# Altium PCB PCB1.PcbDoc
Units mm, origin at the board's own origin, x right, y up, seen from the top; angles counter-clockwise.
Board outline 115 x 155 mm, 2 copper layers (Top Layer, Bottom Layer); 81 components, 46 nets, 213 pads, 63 vias.
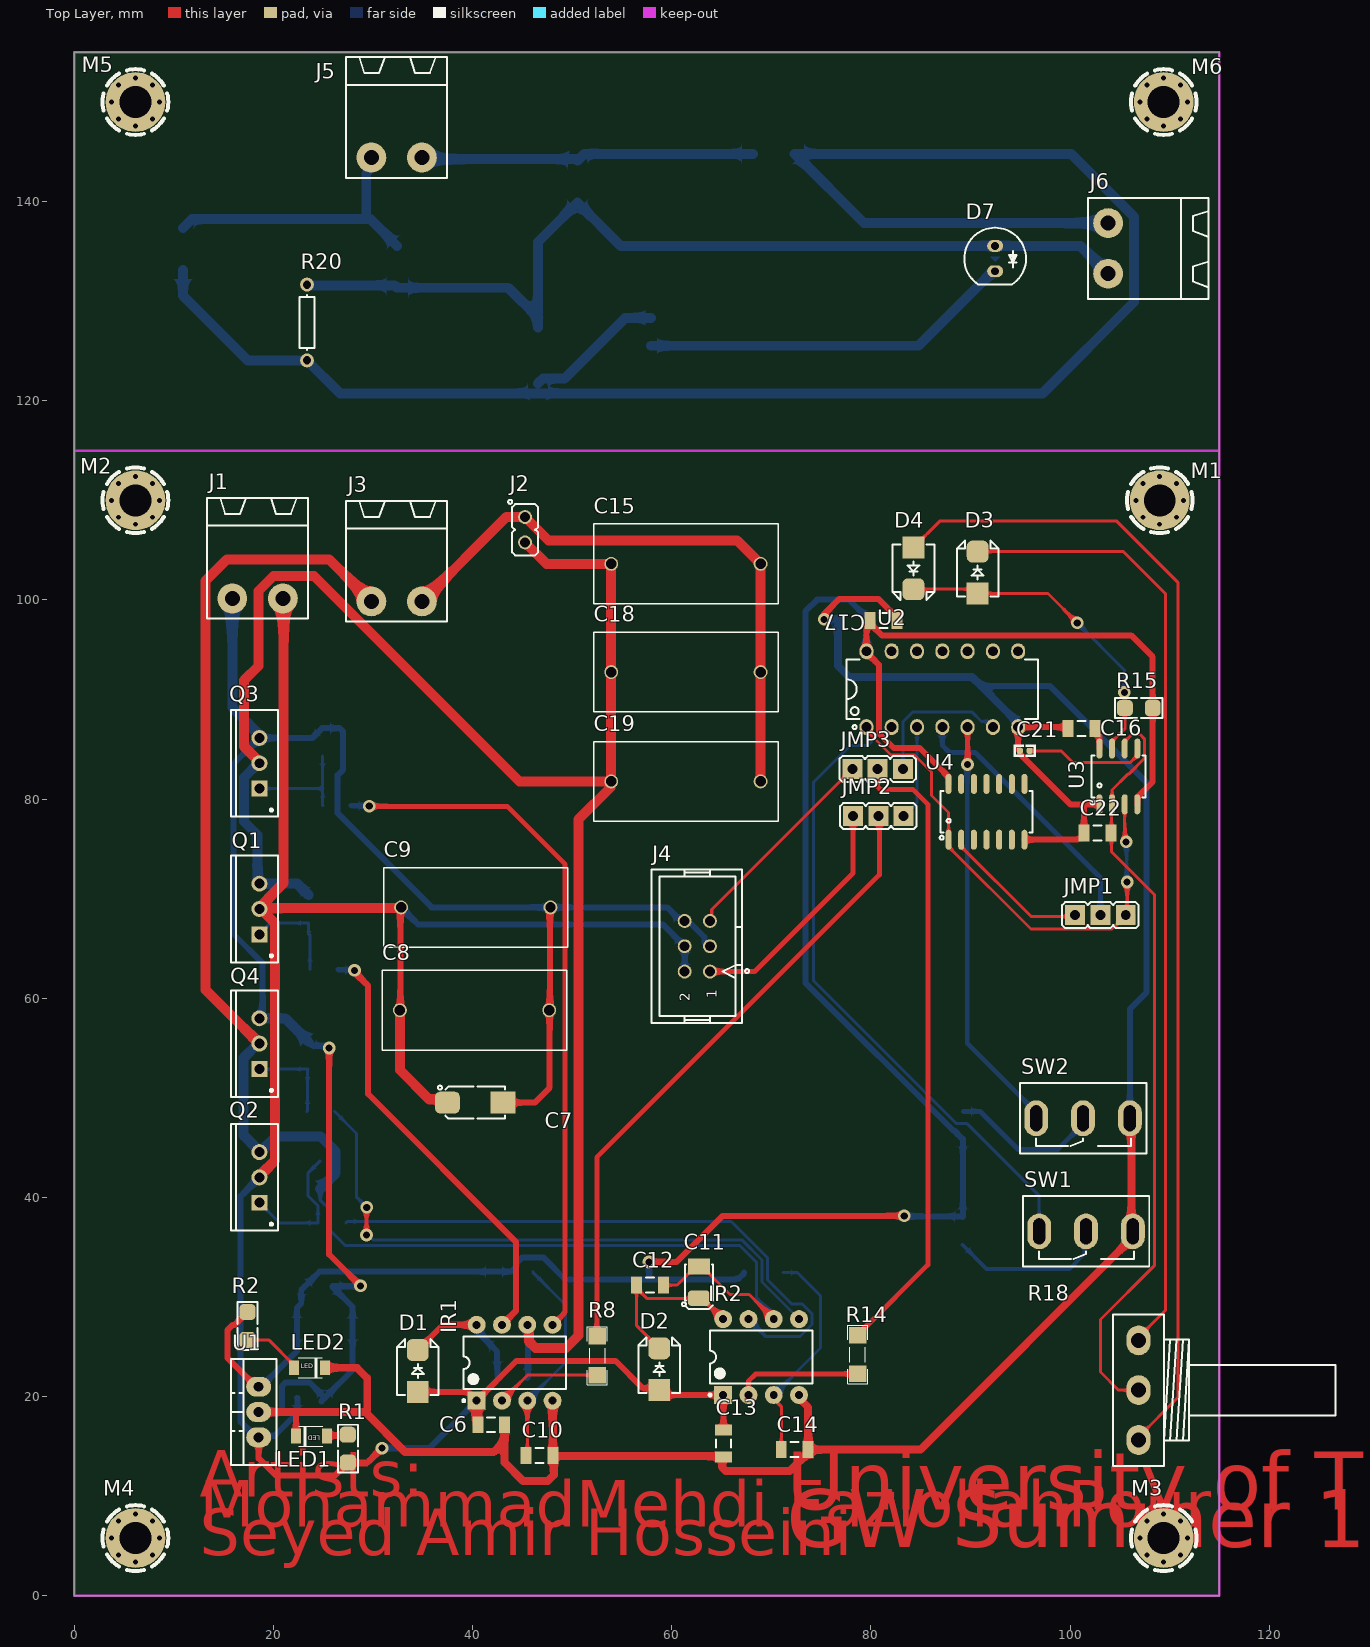
[diagram p0: Top Layer view]
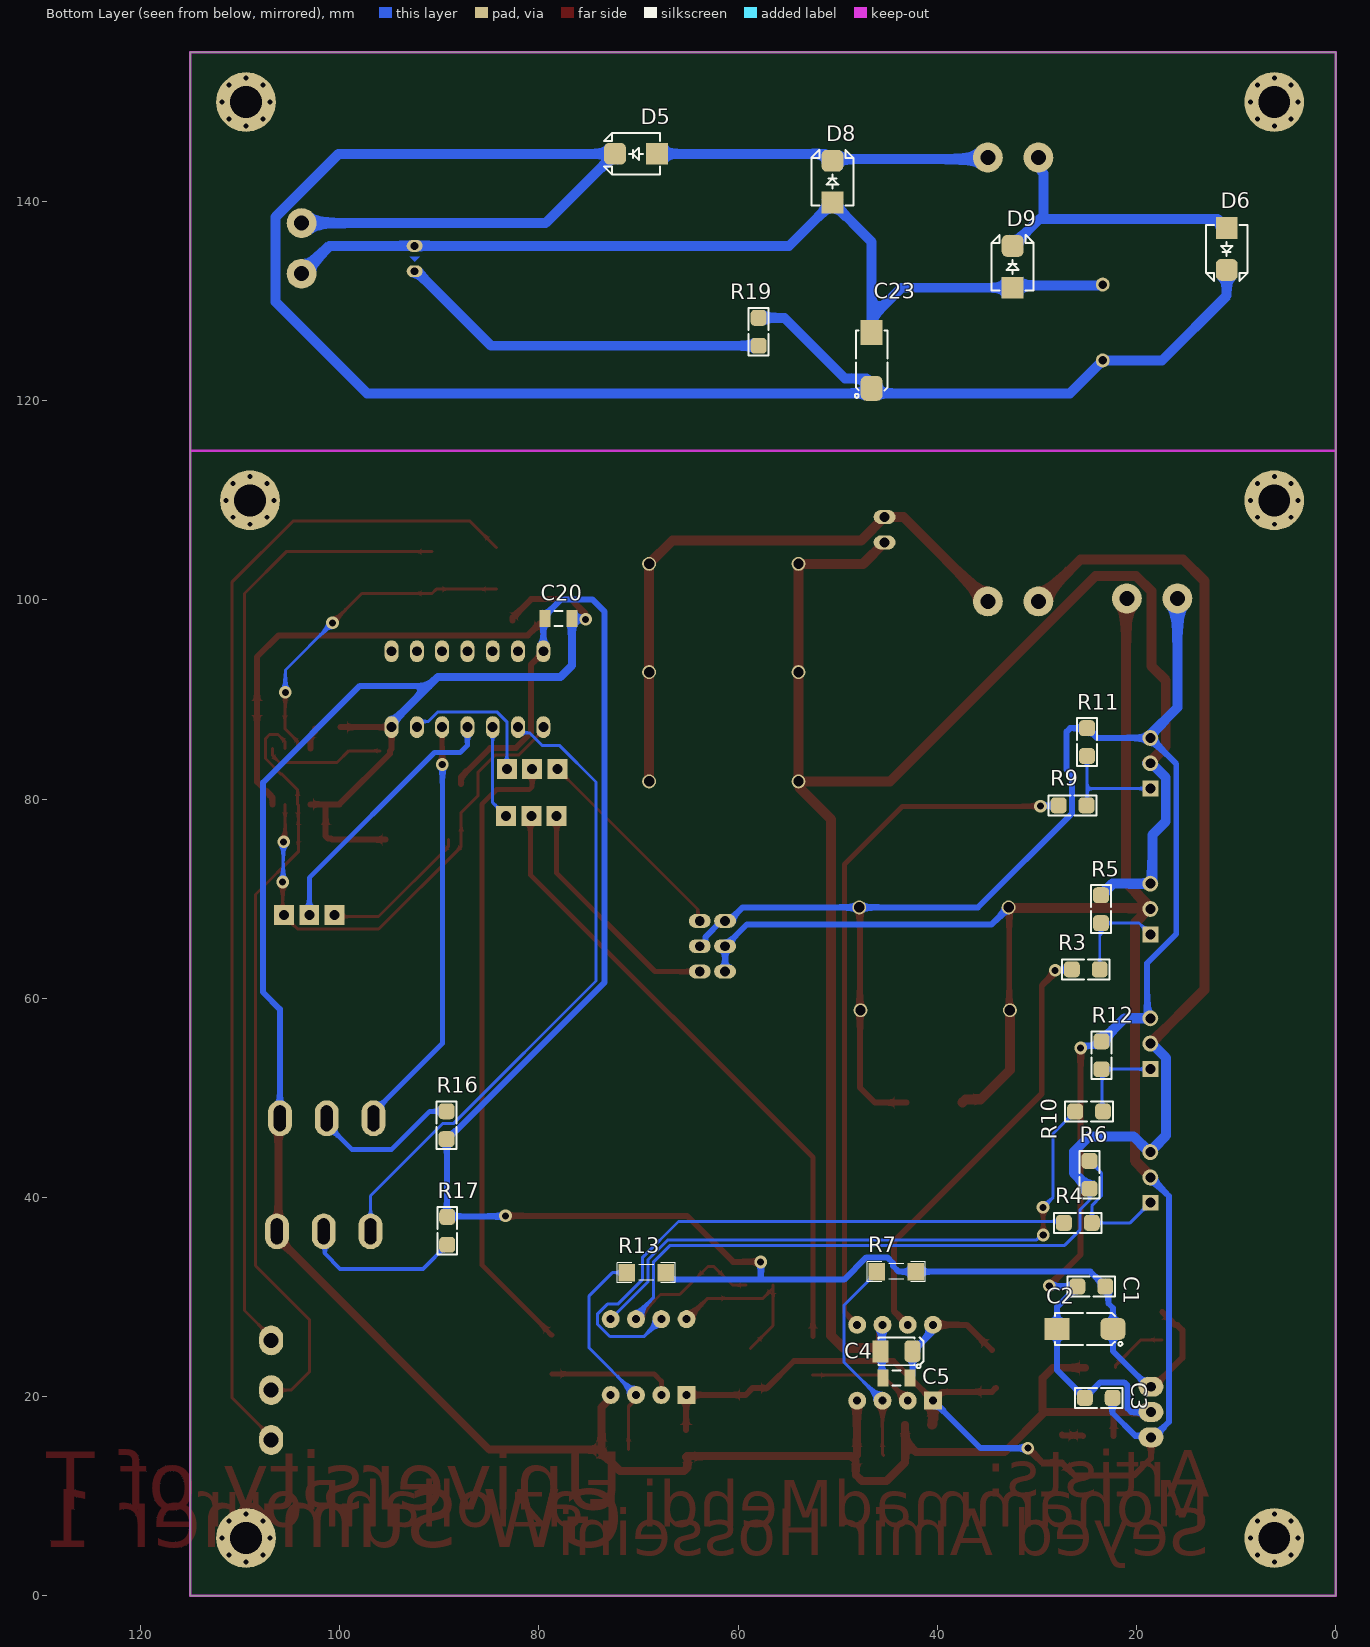
[diagram p1: Bottom Layer view, seen from below]

## Layer stack, top to bottom
Top Solder: solder mask 0.0102, Solder Resist, Dk 3.5
Top Layer: signal copper 0.0356
Dielectric 1: dielectric 0.32, FR-4, Dk 4.8
Bottom Layer: signal copper 0.0356
Bottom Solder: solder mask 0.0102, Solder Resist, Dk 3.5

## Board outline
0,0 0,155 115,155 115,0

## Design rules (kind name [scope] priority, off if disabled: settings)
Clearance [All] p1: gap=0.254 ignorepadtopadclearanceinfootprint=FALSE except(0: Arc-Hole Track-Hole SMDPad-Hole THPad-Hole Via-Hole Fill-Hole Poly-Hole Region-Hole Text-Hole)
Height [All] p1: minheight=0 maxheight=50 prefheight=12.7
PolygonConnect [All] p1: connectstyle=Relief reliefconductorwidth=0.254 reliefentries=4 polygonreliefangle="90 Angle" airgapwidth=0.254
RoutingVias [All] p1: holewidth=0.711 width=1.27 viastyle="Through Hole" minholewidth=0.711 minwidth=1.27 maxholewidth=0.711 maxwidth=1.27
SolderMaskExpansion [All] p1: expansion=0.102 istentingtop=FALSE
Width Width_1 [(InNet('+5') OR InNet('+15') OR InNet('GND'))] p1: maxlimit=1 minlimit=0.6 preferedwidth=0.6
Width [All] p2: maxlimit=1 minlimit=0.3 preferedwidth=1
29 further rules are at their usual default settings.

## Classes and differential pairs
component class Sheet2: C23 D5 D6 D7 D8 D9 J5 J6 M5 M6 R19 R20
component class Sheet1: C1 C2 C3 C4 C5 C6 C7 C8 C9 C10 C11 C12 C13 C14 C15 C16 C17 C18 C19 C20 C21 C22 D1 D2 D3 D4 IR1 IR2 J1 J2 J3 J4 J? JMP1 JMP2 JMP3 LED1 LED2 M1 M2 M3 M4 Q1 Q2 Q3 Q4 R1 R2 R3 R4 R5 R6 R7 R8 R9 R10 R11 R12 R13 R14 R15 R16 R17 R18 SW1 SW2 U1 U2 U3 U4

## Components (designator, comment, footprint, x,y, rotation, side; value= is the part's Value field where it differs from the comment)
C1 "100nF" C1206#1 24.525,31.05 r180 bottom
C2 "10uF" C_TN_6032 25.15,26.8 r0 bottom
C3 "100nF" C1206#1 23.775,19.875 r180 bottom
C4 "10uF-25V" C_TN_3528 44.075,24.55 r0 bottom
C5 "1uF" C1206#2 44.1,21.85 r180 bottom
C6 "1uF" C1206#2 41.875,17.175 r180 top
C7 "33uF" C_TN_6032 40.275,49.525 r0 top
C8 "ECQE6184KF" CAPRR1500W80L1850T800H1600 40.2,58.8 r180 top
C9 "ECQE6184KF" CAPRR1500W80L1850T800H1600 40.325,69.125 r180 top
C10 "100nF" C1206#2 46.725,14.1 r180 top
C11 "10uF-25V" C_TN_3528 62.725,31.475 r90 top
C12 "1uF" C1206#2 57.825,31.2 r180 top
C13 "1uF" C1206#2 65.2,15.3 r90 top
C14 "100nF" C1206#2 72.35,14.675 r180 top
C15 "ECQE6184KF" CAPRR1500W80L1850T800H1600 61.425,103.625 r180 top
C16 "100nF" C1206#2 101.15,87.075 r0 top
C17 "1uF" C1206#2 81.275,97.925 r180 top
C18 "ECQE6184KF" CAPRR1500W80L1850T800H1600 61.425,92.75 r180 top
C19 "ECQE6184KF" CAPRR1500W80L1850T800H1600 61.425,81.775 r180 top
C20 "1uF" C1206#2 78.025,98.15 r0 bottom
C21 "1nF" C0402 95.45,84.85 r0 top
C22 "1nF" c1206 102.75,76.575 r0 top
C23 "33uF" C_TN_6032 46.575,124.05 r90 bottom
D1 "SS34" D_SMB 34.5,22.575 r90 top
D2 "SS34" D_SMB 58.75,22.75 r90 top
D3 "SS34" D_SMB 90.725,102.75 r90 top
D4 "SS34" D_SMB 84.275,103.175 r270 top
D5 "SS34" D_SMB 70.25,144.8 r0 bottom
D6 "SS34" D_SMB 10.925,135.25 r270 bottom
D7 "LED5MM_RED" LED5MM_RED 92.475,134.275 r270 top
D8 "SS34" D_SMB 50.525,142 r90 bottom
D9 "SS34" D_SMB 32.425,133.45 r90 bottom
IR1 "IR2104" 8P3 44.225,23.4 r90 top
IR2 "IR2104" 8P3 68.975,23.975 r90 top
J1 "CONN_TB2" MSTB_2 18.415,100.15 r0 top
J2 "HDRM2" HDR_M_1X2 45.275,107.05 r270 top
J3 "CONN_TB2" MSTB_2 32.375,99.85 r0 top
J4 "IDC_2X3" IDC_2X3 62.57,65.225 r90 top
J5 "CONN_TB2" MSTB_2 32.375,144.425 r0 top
J6 "CONN_TB2" MSTB_2 103.825,135.3 r270 top
JMP1 "Jumper 3 Pin" "Jumper 3" 103.05,68.35 r180 top value=1*3
JMP2 "Jumper 3 Pin" "Jumper 3" 80.75,78.3 r180 top value=1*3
JMP3 "Jumper 3 Pin" "Jumper 3" 80.675,83.025 r180 top value=1*3
LED1 "LED SMD 1206 GREEN" "LED 1206 @" 23.825,16.025 r180 top
LED2 "LED SMD 1206 GREEN" "LED 1206 @" 23.625,22.9 r0 top
M1 "DNP/MH" SCMH_M3 109,110 r0 top
M2 "DNP/MH" SCMH_M3 6.15,110 r0 top
M3 "DNP/MH" SCMH_M3 109.4,5.8 r0 top
M4 "DNP/MH" SCMH_M3 6.15,5.8 r0 top
M5 "DNP/MH" SCMH_M3 6.15,150 r0 top
M6 "DNP/MH" SCMH_M3 109.4,150 r0 top
Q1 "IRF740" "TO-220 AB" 18.6,68.965 r90 top
Q2 "IRF740" "TO-220 AB" 18.6,42.01 r90 top
Q3 "IRF740" "TO-220 AB" 18.6,83.6 r90 top
Q4 "IRF740" "TO-220 AB" 18.6,55.45 r90 top
R1 "3.3K" R1206 27.475,14.775 r270 top
R2 "1.2K" R1206 17.4,27.1 r90 top
R3 "68R" R1206 25.075,62.9 r0 bottom
R4 "68R" R1206 25.875,37.45 r0 bottom
R5 "10K" R1206 23.55,68.95 r270 bottom
R6 "10K" R1206 24.7,42.275 r90 bottom
R7 "10K" RESC4817X04N 44.1,32.55 r180 bottom
R8 "1k" RESC4817X04N 52.525,24.1 r90 top
R9 "68R" R1206 26.4,79.375 r0 bottom
R10 "68R" R1206 24.75,48.625 r0 bottom
R11 "10K" R1206 24.95,85.725 r270 bottom
R12 "10K" R1206 23.5,54.275 r270 bottom
R13 "10K" RESC4817X04N 69.225,32.45 r180 bottom
R14 "1k" RESC4817X04N 78.675,24.225 r90 top
R15 "1K" R1206 106.9,89.15 r0 top
R16 "10K" R1206 89.275,47.25 r90 bottom
R17 "10K" R1206 89.2,36.65 r270 bottom
R18 "POT10K" VOL_R 106.875,20.65 r270 top
R19 "10K" R1206 57.925,126.925 r90 bottom
R20 "Res1" AXIAL-0.3 23.375,127.86 r270 top value=220
SW1 "ToggleSwitch" SWTOG_SPDT_S_7101SY 101.601,36.6 r180 top
SW2 "ToggleSwitch" SWTOG_SPDT_S_7101SY 101.301,47.95 r180 top
U1 "MC78M05" TO220_3 18.525,18.45 r90 top
U2 "SN7408" DIP_14 87.17,91.035 r90 top
U3 "NE555P" SO_8 104.85,82.275 r90 top
U4 "7404" SO_14 91.61,78.725 r90 top

## Footprints (in the part's own frame and the unit in brackets; to place one, negate y for a bottom-side part, rotate by r counter-clockwise, add the part's x,y. Pads: shape width x height; smd on the part's side, far side on the other; paste and mask are expansions set on the pad)
8P3 [mm] "DIP, 8-Leads, Row Spacing 7.62mm, Pitch 2.54mm, Body 9.59x6.61mm"
  rect 1.8x1.8 hole 0.8: 1(-3.81,3.81)
  round 1.8 hole 0.8: 2(-3.81,1.27) 3(-3.81,-1.27) 4(-3.81,-3.81) 5(3.81,-3.81) 6(3.81,-1.27) 7(3.81,1.27) 8(3.81,3.81)
  silkscreen extent -3.93,-5.15 2.65,5.23, body extent -3.88,-5.4 3.88,5.4, height 4.5
AXIAL-0.3 [mm] "Axial Device, Thru-Hole; 2 Leads; 0.3 in Pin Spacing"
  round 1.4 hole 0.85: 1(-3.81,0) 2(3.81,0)
  silkscreen extent -2.77,-0.76 2.77,0.76
C0402 [mm] "CHIP Capacitor, 1.0X0.5mm, 0402"
  rrect50% 0.6x0.6 smd paste-0.05 mask+0.075: 1(-0.5,0) 2(0.5,0)
  silkscreen extent -1.1,-0.6 1.1,0.6, body extent -0.5,-0.26 0.5,0.27, height 0.36
C1206#1 [mm] "CHIP Capacitor, 3.2X1.6mm, 1206"
  rrect50% 1.6x1.6 smd paste-5 mask+0.075: 1(-1.4,0) 2(1.4,0)
  Top Layer pour cut-out: -0.8,1 -0.8,-1 0.8,-1 0.8,1
  silkscreen extent -2.4,-1 2.4,1, body extent -1.6,-0.8 1.6,0.8, height 1
C1206#2 [mm] "Chip Capacitor, Body 3.2x1.6mm, IPC High Density"
  rect 1.1x1.7 smd: 1(-1.35,0) 2(1.35,0)
  silkscreen extent -0.4,-0.75 0.4,0.75, body extent -1.7,-0.9 1.7,0.9, height 1.3
c1206 [mm] "Chip Capacitor, Body 3.2x1.6mm, IPC High Density"
  rect 1.1x1.7 smd: 1(-1.35,0) 2(1.35,0)
  silkscreen extent -0.4,-0.75 0.4,0.75, body extent -1.7,-0.9 1.7,0.9, height 1.3
C_TN_3528 [mm] "CAPACITOR, TAN B, TAN H, TAN T, TAN M, 3528P, 1210P, 3.5X2.8mm"
  rrect50% 1.6x2.2 smd mask+0.1: 1(-1.6,0)
  rect 1.6x2.2 smd mask+0.1: 2(1.6,0)
  Top Layer pour cut-out: -0.889,1.4 -0.889,-1.4 0.889,-1.4 0.889,1.4
  silkscreen extent -2.7,-1.4 1.8,1.7, body extent -1.85,-1.47 1.85,1.46, height 2.03
C_TN_6032 [mm] "CAPACITOR, TAN C, TAN F, TAN U, TAN L, 6032P, 6.0X3.2mm"
  rrect50% 2.5x2.2 smd: 1(-2.8,0)
  rect 2.5x2.2 smd: 2(2.8,0)
  Top Layer pour cut-out: -2.032,1.6 2.032,1.6 2.032,-1.6 -2.032,-1.6
  silkscreen extent -3.75,-1.6 3,1.7, body extent -3.15,-1.75 3.15,1.75, height 2.8
CAPRR1500W80L1850T800H1600 [mm]
  round 1.4 hole 1.05: 1(-7.5,0) 2(7.5,0)
  silkscreen extent -9.25,-4 9.25,4
D_SMB [mm] "SMB Molded Diode, 2-Leads, Body 4.3x3.5mm"
  rect 2.2x2.2 smd: 1(-2.1,0)
  rrect50% 2.2x2.2 smd: 2(2.1,0)
  Top Layer pour cut-out: -1.524,2.1 -1.524,-2.1 1.524,-2.1 1.524,2.1
  silkscreen extent -2.4,-2.1 3.2,2.1, body extent -2.75,-1.95 2.75,1.95, height 2.45
DIP_14 [mm] "DIP, pitch 2.54mm, 300mil Width"
  oval 1.6x1.4 / inner round 1.4 / far side oval 2.2x1.4 hole 1: 1(-3.81,7.62) 2(-3.81,5.08) 3(-3.81,2.54) 4(-3.81,0) 5(-3.81,-2.54) 6(-3.81,-5.08) 7(-3.81,-7.62) 8(3.81,-7.62) 9(3.81,-5.08) 10(3.81,-2.54) 11(3.81,0) 12(3.81,2.54) 13(3.81,5.08) 14(3.81,7.62)
  silkscreen extent -4,-9.6 3,9.6, body extent -4,-9.53 4,9.52, height 3.81
HDR_M_1X2 [mm] "Connector; Header; 2 Position"
  round 1.4 / inner round 1.4 / far side oval 1.4x2.2 hole 1 mask+0.1: 1(-1.27,0) 2(1.27,0)
  silkscreen extent -3,-1.7 2.57,1.3, body extent -2.54,-1.25 2.44,1.25, height 8.72
IDC_2X3 [mm]
  round 1.4 / inner round 1.4 / far side oval 1.4x2.2 hole 1 mask+0.1: 1(-2.54,-1.27) 2(-2.54,1.27) 3(0,-1.27) 4(0,1.27) 5(2.54,-1.27) 6(2.54,1.27)
  silkscreen extent -7.7,-5.2 7.7,4.6, body extent -7.64,-4.42 7.64,4.75, height 9.13
"Jumper 3" [mm]
  rect 2x2 hole 1 mask+0.1: 1(-2.54,0) 2(0,0) 3(2.54,0)
  silkscreen extent -3.84,-1.3 3.84,1.3, body extent -3.78,-1.27 3.84,1.27, height 8.57
LED5MM_RED [mm] "LED THD 5MM RED"
  oval 1.2x1.6 hole 0.8: 1(-1.27,0) 2(1.27,0)
  Bottom Layer region: -0.2,0.5 -0.2,-0.5 0.3,0
  silkscreen extent -3.1,-3.1 2.6,3.1, body extent -3,-3 2.5,3, height 9.14
"LED 1206 @" [mm] "LED, 1206"
  rect 1x1.5 smd mask+0.075: 1(-1.55,0) 2(1.55,0)
  Top Layer pour cut-out: -1.6,0.889 -1.6,-0.889 1.55,-0.889 1.55,0.889
  silkscreen extent -1.14,-1.01 1.27,1, body extent -1.6,-0.8 1.6,0.8, height 0.68
MSTB_2 [mm] "PHOENIX MSTB 2, 5-G, 5.08mm pitch, 2pin"
  round 3 hole 1.5: 1(-2.54,0) 2(2.54,0)
  silkscreen extent -5.08,-2.03 5.08,10.1, body extent -5,-2 5,10, height 8.7
R1206 [mm] "CHIP RESISTOR 1/4 WATT, Body 3.2x1.6mm,1206, 3216"
  rrect50% 1.6x1.6 smd paste-5 mask+0.075: 1(-1.4,0) 2(1.4,0)
  Top Layer pour cut-out: -0.8,1 -0.8,-1 0.8,-1 0.8,1
  silkscreen extent -2.4,-1 2.4,1, body extent -1.68,-0.86 1.68,0.86, height 0.85
RESC4817X04N [mm]
  rect 1.65x1.75 smd: 1(-1.95,0) 2(1.95,0)
  silkscreen extent -2.92,-1.02 2.92,1.02, body extent -1.6,-0.8 1.6,0.8, height 1
SCMH_M3 [mm] "SCREW mouting, M3, 3.0mm diameter and 6.0mm PanHead"
  round 6 / inner round 3.5 / far side round 6 hole 3.2 mask+0.1: 1(0,0)
  Top Layer pour cut-out: 0,3.5 -0.229,3.5 -0.684,3.44 -1.127,3.321 -1.551,3.146 -1.949,2.916 -2.313,2.637 -2.637,2.313 -2.916,1.949 -3.146,1.551 -3.321,1.127 -3.44,0.684 -3.5,0.229 -3.5,0 -3.5,0 -3.5,-0.229 -3.44,-0.684 -3.321,-1.127 -3.146,-1.551 -2.916,-1.949 -2.637,-2.313 -2.313,-2.637 -1.949,-2.916 -1.551,-3.146 -1.127,-3.321 -0.684,-3.44 -0.229,-3.5 0,-3.5 0.229,-3.5 0.684,-3.44 1.127,-3.321 1.551,-3.146 1.949,-2.916 2.313,-2.637 2.637,-2.313 2.916,-1.949 3.146,-1.551 3.321,-1.127 3.44,-0.684 3.5,-0.229 3.5,0 3.5,0.229 3.44,0.684 3.321,1.127 3.146,1.551 2.916,1.949 2.637,2.313 2.313,2.637 1.949,2.916 1.551,3.146 1.127,3.321 0.684,3.44 0.229,3.5 0,3.5
  Bottom Layer pour cut-out: 0,3.5 -0.229,3.5 -0.684,3.44 -1.127,3.321 -1.551,3.146 -1.949,2.916 -2.313,2.637 -2.637,2.313 -2.916,1.949 -3.146,1.551 -3.321,1.127 -3.44,0.684 -3.5,0.229 -3.5,0 -3.5,0 -3.5,-0.229 -3.44,-0.684 -3.321,-1.127 -3.146,-1.551 -2.916,-1.949 -2.637,-2.313 -2.313,-2.637 -1.949,-2.916 -1.551,-3.146 -1.127,-3.321 -0.684,-3.44 -0.229,-3.5 0,-3.5 0.229,-3.5 0.684,-3.44 1.127,-3.321 1.551,-3.146 1.949,-2.916 2.313,-2.637 2.637,-2.313 2.916,-1.949 3.146,-1.551 3.321,-1.127 3.44,-0.684 3.5,-0.229 3.5,0 3.5,0.229 3.44,0.684 3.321,1.127 3.146,1.551 2.916,1.949 2.637,2.313 2.313,2.637 1.949,2.916 1.551,3.146 1.127,3.321 0.684,3.44 0.229,3.5 0,3.5
  silkscreen extent -3.3,-3.3 3.3,3.3
SO_8 [mm] "SOP-8, 5x3.9mm body 1.27mm pitch, SOT96-1, M08A, S8, SOIC8, VO8, MS-012AA(JEDEC), R-8, 8S2, VOG8"
  oval 2x0.6 smd: 1(-2.8,1.905) 2(-2.8,0.635) 3(-2.8,-0.635) 4(-2.8,-1.905) 5(2.8,-1.905) 6(2.8,-0.635) 7(2.8,0.635) 8(2.8,1.905)
  silkscreen extent -2.8,-2.7 2.1,2.8, body extent -3,-2.45 3,2.45, height 1.7
SO_14 [mm] "SOP, SOIC, 3.9mm width, 1.27mm pitch,"
  oval 2x0.6 smd: 1(-2.8,3.81) 2(-2.8,2.54) 3(-2.8,1.27) 4(-2.8,0) 5(-2.8,-1.27) 6(-2.8,-2.54) 7(-2.8,-3.81) 8(2.8,-3.81) 9(2.8,-2.54) 10(2.8,-1.27) 11(2.8,0) 12(2.8,1.27) 13(2.8,2.54) 14(2.8,3.81)
  silkscreen extent -2.8,-4.6 2.1,4.7, body extent -3.1,-4.38 3.1,4.37, height 1.75
SWTOG_SPDT_S_7101SY [mm] "Switch Toggle, SPDT Straight, 7X12mm, 7101SYZBE CK"
  oval 2.4x3.6 hole 1.2 slot 2.6 at 90 deg: 1(0,0) 2(4.699,0) 3(-4.699,0)
  silkscreen extent -6.35,-3.56 6.35,3.56, body extent -6.35,-3.42 6.35,3.44, height 28.62
TO220_3 [mm] "TO-220 3 LEAD, TO-262, pitch: 2.54mm  10x4.5mm"
  oval 2x2.5 hole 1: 1(-2.54,0) 2(0,0) 3(2.54,0)
  silkscreen extent -5.33,-1.78 5.33,2.79, body extent -5.2,-1.85 5.2,2.65, height 19
"TO-220 AB" [mm] "Epoxy meets UL94, V0-Design:Abbas Basereh"
  rect 1.6x1.6 hole 1: 1(-2.54,0)
  round 1.6 hole 1: 2(0,0) 3(2.54,0)
  silkscreen extent -5.35,-1.85 5.35,2.85, body extent -5.08,-1.65 5.08,2.92, height 18.54
VOL_R [mm] "VOULME RIGHT ANGLE"
  oval 3x2.4 hole 1.5: 1(-5,0) 2(0,0) 3(5,0)
  silkscreen extent -7.62,-2.54 7.62,19.78, body extent -10.76,-5 10.93,27.8, height 24.54

## Part data
C1 C3: library part CAP_SMD_MLCC_1206, "CAP, MLCC, -F, -V, MATERIAL, -%, 0201", ASSEMBLY=ASSEMBLY, MANF=-, MANF_P#=MANF_PART#, PARAM="-, -%", PARAM2=-V, PRICE="100= 1$"
C2 C7 C23: library part CAP_SMD_TAN_6032, "CAP, SMD, TAN,", PARAM2=-V
C4 C11: library part CAP_SMD_TAN, "CAP, SMD, TAN,", PARAM=25V
C5 C6 C10 C12 C13 C14 C16 C17 C20 C21 C22: library part CAP_SMD_MLCC, "CAP, MLCC, 1nF, 50V, C0G, 10%, 0402", ASSEMBLY=ASSEMBLY, DESC="CAP, MLCC, 1nF, 50V, C0G, 10%, 0402", MANF=Murata, MANF_P#=MANF_PART#, PARAM="C0G, 10%", PARAM2=50V, PRICE="100= 1$"
C8 C9 C15 C18 C19 U3: Package=None, Availability=Unavailable, PRICE=None
  C8 C9 C15 C18 C19: MP=ECQE6184KF
  U3: MP=NE555P
D1 D2 D3 D4 D5 D6 D8 D9: library part DIODE_SMD_SCHOTTKY_SS34, "DIODE, SCHOTTKY, 40V, 3A", ASSEMBLY=ASSEMBLY, DESC=DESCRIPTION, MANF=VISHAY, MANF_P#=SS34, PARAM=20V, PARAM2=3A, PRICE=PRICE
D7: library part LED_THD_5MM_RED, "LED, THD, 5MM, RED", ASSEMBLY=ASSEMBLY, DESC=DESCRIPTION, MANF=MANF, MANF_P#=MANF_PART#, PARAM2=2.2V, PRICE=PRICE
IR1 IR2: library part IR2104S, "Half-Bridge Gate Driver IC Non-Inverting", Package="SO-8 Infineon", Availability=Unavailable, MF="Infineon Technologies", MP=IR2104S, PRICE=None, SnapEDA_Link=https://www.snapeda.com/parts/IR2104S/Infineon%20Technologies/view-part/582439/?ref=snap
J1 J3 J5 J6: library part CONN_MSTB_2, "CONN, PHOENIX MSTB, 5-G, 5.08mm pitch", PARAM=12A, PARAM2=320V
J2: library part HDR_M_1X2, "CONN, HEADER, Male, pitch: 2.54mm, 2POS"
J4: "CONN, IDC, Male, pitch: 2.54mm, 6POS"
JMP1 JMP2 JMP3: Package=Jumper, Category=Pin-Header, DESC="2.54 mm"
M1 M2 M3 M4 M5 M6: library part SCMH_M3, "SCREW mouting, M3, 3.0mm diameter and 6.0mm PanHead", ASSEMBLY=DNP
Q1 Q2 Q3 Q4: "MOSFET N-CH 400V 10A TO-220AB", ComponentLink1Description=http://www.digikey.com/products/en/discrete-semiconductor-products/19, ComponentLink1URL=http://www.digikey.com/product-detail/en/vishay-siliconix/IRF740PBF/IRF740PBF-ND/812037, ComponentLink2Description=Datasheet, ComponentLink2URL=http://www.roboeq.ir/files/id/1101/name/IRF740A.pdf, DatasheetVersion=2017-1-12, PackageDescription="MOSFET N-CH 400V 10A TO-220AB", PackageReference=TO-220AB, PackageVersion=2017-1-12, Published=2017-1-12, Publisher="Abbas Basereh"
R1 R2 R3 R4 R5 R6 R9 R10 R11 R12 R15 R16 R17 R19: library part RES_SMD_1206, "RESISTOR, SMD", ASSEMBLY=ASSEMBLY, DESC=DESCRIPTION, DIST#=MOUSER, MANF=-, MANF_P#=-, PARAM=-W, PARAM2=1%, PRICE="100= 0.5$"
R7 R8 R13 R14: library part "RES 1206 0.25W", "RES 1206", Data=16-12-2016, Desc.="RES SMD 1206", Designer="Abbas Basereh"
R18: library part RES_THD_POT_VOLUME, "RESISTOR, THD, Potentiometer Volume"
R20: "Resistor", LatestRevisionDate=17-Jul-2002, LatestRevisionNote="Re-released for DXP Platform.", PackageDescription="Axial Device, Thru-Hole; 2 Leads; 0.3 in Pin Spacing", PackageReference=AXIAL-0.3, Published=8-Jun-2000, Publisher="Altium Limited"
SW1 SW2: library part SWTOG_SPDT_S_7101SY, "SWITCH, TOGGLE, SPDT, THD", ASSEMBLY=ASSEMBLY, DESC=DESCRIPTION, MANF=C&K, MANF_PART#=7101SYZBE, PARAM="20VAC, 5A", PRICE=4.5$
U1: library part VREG_78M05_TO220, "REG, Linear, Fixed, 5v, 1.5A, TO-220", MANF="TI, ST, FAIRCHILD, ON, NJR, TS", MANF_P#="LM78M05CT, LM7805CT, LM7805ACT, UA7805CKC, L7805ABV, L7805ACV, L7805CV, L78M05CV, KA78T05, KA7805ETU, MC78M05BT, MC78M05CT, MC7805ACT, MC7805ABT, NCP7805TG, NJM7805FA, TS7805CZ", PARAM="5v, 1.5A", PARAM2=PARAM2
U2: library part ANDx4_SN7408_DIP, "Gate, AND, Quad 2 Input", MANF="Texas Instruments", MANF_P#=SN74LS08N
U4: library part NOTx6_SN74HC04_SOP14, "Inverter IC Logic-level 6 section SOP-14 SMD", MANF="Texas Instruments", MANF_P#=SN74HC04NSR, PARAM="5.2mA, 5.2mA", PARAM2="2 V ~ 6 V"
LED1 LED2: Category=LED, Code Anbar=h.k

## Via types
v1: diameter 0.8, hole 0.5, Top Layer to Bottom Layer, 48 vias
v2: diameter 1.27, hole 0.711, Top Layer to Bottom Layer, 15 vias

## Nets (pads, with @x,y where several pads share a name; then routed paths per layer and width w, separated by ;. In a path a pad name is that pad's centre, name@x,y a point inside that pad or via, vN(x,y) a via of type N, cw(c..) or ccw(c..) an arc to the next point about the centre after c; other vN are vias at no path point)
+5: C1.2 C2.1 C17.2 C20.2 R2.2 R7.2 R13.2 R15.2 R16.1 R17.1 U1.3 U2.14 U3.4 U4.14 | length 248.8
  Top Layer w0.6: R2.2 16.081,27.181 15.882,27.181 15.375,26.674 15.375,23.89 18.275,20.99 U1.3 ; v2(57.725,33.525) 60.492,33.525 65.117,38.15 v2(83.35,38.15) ; U4.14 87.8,82.225 84.892,85.133 82.309,85.133 80.804,86.638 80.804,93.491 79.55,94.745 U2.14 79.55,97.25 79.925,97.625 81.1,96.45 106.129,96.45 108.3,94.279 R15.2 108.3,81.72 106.755,80.175 U3.4
  Bottom Layer w0.6: U1.3 18.775,20.99 22.35,24.565 C2.1 22.35,28.901 22.799,29.35 22.799,30.724 C1.2 24.625,32.55 43.875,32.55 44.435,33.11 44.435,33.419 44.996,33.979 47.104,33.979 49.333,31.75 57.866,31.75 ; v2(57.725,33.525) 57.725,31.891 57.866,31.75 ; R13.2 67.275,32.4 66.75,31.875 66.524,31.875 66.399,31.75 57.866,31.75 ; U2.14 79.55,98.45 79.375,98.45 77.8,100.025 74.6,100.025 73.425,98.85 73.425,61.567 88.25,46.742 88.329,46.742 89.221,45.85 R16.1 89.237,45.813 89.237,38.087 R17.1 89.15,38.1 83.4,38.1 v2(83.35,38.15)
+15: C3.2 C6.2 C7.1 C8.2 C9.2 C13.2 D1.1 D2.1 IR1.1 IR2.1 J1.2 J4.2 J4.4 Q1.2 Q2.2 R1.2 U1.1 | length 232.7
  Top Layer w0.6: U1.1@18.275,15.91 U1.1 18.525,13.806 20.275,12.056 26.156,12.056 R1.2 29.45,13.375 v2(30.9,14.825) ; C8.2 32.762,58.863 C9.2@32.762,69.063 ; D1.1@34.101,20.874 D1.1 39.53,20.475 IR1.1 44.404,23.579 54.371,23.579 57.101,20.849 58.551,20.849 59.235,20.165 IR2.1 65.2,20.13 C13.2
  Top Layer w1: Q1.2@18.5,69.065 21.033,71.598 21.033,100.072 J1.2 ; Q2.2 18.6,42.155 20.154,43.709 20.154,67.537 18.726,68.965 Q1.2 ; Q1.2@18.6,69.048 32.748,69.048 32.762,69.063 C9.2 ; C8.2 32.7,52.8 35.65,49.85 37.15,49.85 C7.1 ; IR1.1 40.415,17.685 40.475,17.625 40.475,17.225 C6.2
  Bottom Layer w0.6: Q2.2 16.721,40.131 16.721,17.464 18.275,15.91 U1.1 18.676,16.061 20.111,16.061 22.4,18.35 22.4,19.85 C3.2 ; v2(30.9,14.825) 35.65,14.825 IR1.1 ; C9.2 34.525,67.425 59.1,67.425 J4.4 J4.2
coil: D5.1 D8.2 J5.2 | length 33.7
  Bottom Layer w1: J5.2 35.077,144.263 50.363,144.263 D8.2 50.552,144.1 51.252,144.8 D5.1
FR: SW1.2 U2.2 | length 65.3
  Bottom Layer w0.3: U2.2 82.09,87.162 81.582,86.654 80.94,86.654 79.69,85.403 77.942,85.403 74.25,81.711 74.25,61.738 88.542,47.446 89.616,47.446 96.902,40.16 SW1.2
GND: C1.1 C2.2 C3.1 C6.1 C7.2 C8.1 C9.1 C10.1 C13.1 C14.1 C16.1 C17.1 C20.1 C21.1 C22.1 IR1.4 IR2.4 J1.1 J4.3 J4.6 LED1.2 LED2.2 Q3.3 Q4.3 R11.1 R12.1 SW1.3 SW2.3 U1.2 U2.7 U3.1 U4.7 | length 449.5
  Top Layer w0.6: LED1.2 22.275,18.4 22.325,18.45 ; v2(25.6,55) 25.6,34.275 v2(28.75,31.125) ; C7.2 46.25,49.525 47.75,51.025 47.75,58.75 C8.1 47.762,58.863 47.762,69.063 C9.1 ; J4.6@61.2,67.85 61.285,67.765 J4.6 ; v2(75.3,98.05) 75.3,98.6 76.775,100.075 80.775,100.075 82.625,98.225 C17.1 ; U4.7 100.75,75.925 100.85,76.025 101.15,76.025 101.4,76.275 C22.1 101.4,79.388 101.487,79.475 ; C16.1@99.9,87.225 U2.7 94.79,85.01 C21.1 94.95,84.554 100.029,79.475 101.487,79.475 ; U3.1 101.487,79.475
  Top Layer w0.8: U1.2 22.325,18.45 29.225,18.45 ; LED2.2 28.375,22.9 29.425,21.85 29.425,18.65 29.225,18.45 ; C6.1 43.225,15.55 ; IR1.4 48.055,19.57 48.055,14.12 C10.1 ; IR2.4 72.785,19.84 73.7,18.925 C14.1 ; SW2.3 106.15,47.8 106.15,36.75 SW1.3 106.3,36 84.975,14.675 C14.1 ; 29.225,18.45 33.225,14.45 42.125,14.45 43.225,15.55 ; 43.225,15.55 43.225,13.375 45.075,11.525 47.55,11.525 48.175,12.15 48.175,13.55 48.65,14.025 65.125,14.025 C13.1 65.075,13.825 65.075,12.876 65.426,12.525 71.85,12.525 73.7,14.375 C14.1
  Bottom Layer w0.6: U1.2 20.524,18.45 20.875,18.801 20.875,21.074 21.226,21.425 23.625,21.425 C3.1 ; Q3.3 15.992,83.532 15.992,66.45 18.925,63.517 18.925,58.611 Q4.3@18.766,58.452 ; Q3.3@18.925,86.14 23.911,86.14 24.896,87.125 R11.1 26.65,87.125 27.001,86.774 27.001,82.954 26.446,82.399 26.446,78.58 35.901,69.125 C9.1 59.54,69.125 60.9,67.765 J4.6 61.667,67.765 63.287,66.145 63.287,65.595 63.656,65.225 J4.3 ; R12.1 23.938,55.237 25.182,55.237 25.419,55 v2(25.6,55) ; C3.1@24.825,19.525 C3.1 ; v2(28.75,31.125) 28.713,31.088 25.962,31.088 C1.1 27.95,29.025 C2.2 27.95,22.65 C3.1 ; 91.04,91.375 97.975,91.375 107.698,81.652 107.698,60.606 106,58.908 SW2.3
  Bottom Layer w0.8: v2(75.3,98.05) 75.35,98.1 76.625,98.1 C20.1 76.675,93.425 77.825,92.275 90.14,92.275 91.04,91.375 94.79,87.625 U2.7
  Bottom Layer w1: J1.1 15.875,89.19 Q3.3@18.762,86.303 ; Q4.3@18.575,57.99 Q4.3 21.185,57.99 R12.1
HO1: IR1.7 R3.2 | length 44.6
  Top Layer w0.6: v2(28.15,62.8) 28.15,62.625 29.5,61.275 29.5,50.4 44.35,35.55 44.35,28.605 IR1.7
  Bottom Layer w0.5: R3.2 26.525,62.85 28.1,62.85 v2(28.15,62.8)
HO2: IR2.7 R4.2 | length 61
  Bottom Layer w0.3: R4.2 27.413,37.588 65.975,37.588 69.612,33.951 69.612,31.742 72.068,29.286 73.128,29.286 74.089,28.325 74.089,27.245 72.869,26.025 69.465,26.025 IR2.7 IR2.7@67.705,28.096
IN_1: JMP2.2 R8.2 | length 64.1
  Top Layer w0.3: R8.2@52.475,26.05 R8.2
  Top Layer w0.5: R8.2@52.475,26.05 52.475,44.025 80.85,72.4 80.85,78.2 JMP2.2
IN_1_A: JMP2.1 U2.3 | length 9.5
  Bottom Layer w0.3: JMP2.1 84.63,79.64 U2.3
IN_1_A_i: JMP1.1 U2.1 U3.3 U4.1 | length 51.4
  Top Layer w0.3: U2.1 79.55,86.896 82.017,84.429 84.382,84.429 86.091,82.72 86.091,80.355 87.8,78.646 U4.1 87.8,75.225 96.079,66.946 104.217,66.946 104.74,67.469 104.74,67.5 JMP1.1 ; v2@105.485,75.815 U3.3 ; v2(105.725,71.675) 105.725,68.485 JMP1.1 ; JMP1.1@106.44,67.5 106.44,68.35 JMP1.1
  Bottom Layer w0.3: v2(105.625,75.7) 105.675,75.65 105.675,71.725 v2(105.725,71.675)
IN_1_D: J4.1 JMP2.3 | length 24.2
  Top Layer w0.5: J4.1 68.335,62.685 78.21,72.56 JMP2.3
IN_2: JMP3.2 R14.2 | length 63.8
  Top Layer w0.5: R14.2 78.725,26.175 79.3,26.75 79.3,26.8 85.725,33.225 85.725,79.475 84.25,80.95 80.968,80.95 80.675,81.243 JMP3.2
IN_2_A: JMP3.1 U2.6 | length 14.8
  Bottom Layer w0.3: JMP3.1 83.215,87.771 84.173,88.729 90.167,88.729 91.1,87.796 91.742,87.796 92.25,87.288 U2.6
IN_2_A_i: JMP1.2 U2.4 | length 27
  Bottom Layer w0.5: U2.4 87.17,85.405 87.9,84.675 90.475,84.675 103.05,72.1 JMP1.2
IN_2_D: J4.5 JMP3.3 | length 21.2
  Top Layer w0.3: J4.5 64.025,67.95 64.025,68.915 JMP3.3
LO1: IR1.5 R9.2 | length 70.7
  Top Layer w0.5: v2(29.625,79.3) 29.65,79.275 43.475,79.275 49.3,73.45 49.3,28.475 IR1.5
  Bottom Layer w0.5: R9.2 27.837,79.337 29.588,79.337 v2(29.625,79.3)
LO2: IR2.5 R10.2 | length 62
  Top Layer w0.3: v2(29.35,36.228) 29.35,39 v2(29.375,39)
  Bottom Layer w0.3: R10.2 28.35,46.425 28.35,40.025 v2(29.375,39) ; v2(29.35,36.228) 29.526,36.228 30.011,35.743 67.037,35.743 69.058,33.722 69.058,31.512 IR2.5
NetC4_1: C4.1 C5.2 D1.2 IR1.8 | length 13.3
  Top Layer w0.6: D1.2 37.035,27.21 IR1.8
  Bottom Layer w0.6: IR1.8 40.645,26.98 40.645,26.355 C4.1@42.45,24.55 ; C4.1 42.475,22.751 42.5,22.726 42.5,22.1 C5.2
NetC11_1: C11.1 C12.2 D2.2 IR2.8 | length 17.3
  Top Layer w0.3: C12.2 C12.2@56.475,30.9 ; D2.2 56.475,27.125 C12.2@56.475,30.9 ; IR2.8 65.14,27.785 63.05,29.875 C11.1 57.5,29.875 C12.2@56.475,30.9
NetC15_1: C15.1 C18.1 C19.1 J2.1 J3.2 | length 61.3
  Top Layer w1: J3.2 43.385,108.32 J2.1 47.622,105.973 66.577,105.973 C15.1 C18.1 C19.1
NetC16_2: C16.2 U3.8 | length 2.2
  Top Layer w0.6: C16.2 102.5,86.775 102.945,86.33 U3.8
NetC21_2: C21.2 U3.5 | length 12.3
  Top Layer w0.3: C21.2 99.079,84.85 100.258,83.671 106.051,83.671 106.755,84.375 U3.5
NetC22_2: C22.2 R18.2 U3.2 U3.6 | length 76.7
  Top Layer w0.3: U3.6 105.485,85.775 106.189,86.479 107.047,86.479 107.459,86.067 107.459,84.083 105.88,82.504 105.794,82.504 104.215,80.925 U3.2 104.158,79.418 104.158,74.712 108.458,70.411 108.458,33.145 103.05,27.738 103.05,22.475 104.875,20.65 R18.2
NetC23_1: C23.1 D5.2 D6.2 J6.1 R19.2 R20.2 | length 199.6
  Bottom Layer w1: D6.2 10.925,130.55 17.425,124.05 R20.2 26.675,120.75 46.575,120.75 97.25,120.75 106.425,129.925 106.425,138.475 100.1,144.8 D5.2 79.31,137.84 J6.1 ; C23.1@46.575,121.75 47.075,122.25 49.25,122.25 55.325,128.325 R19.2
NetC23_2: C23.2 D7.1 D8.1 D9.1 J6.2 R20.1 | length 95
  Bottom Layer w1: R20.1 23.452,131.593 32.182,131.593 D9.1 43.575,131.35 46.575,128.35 ; C23.2@46.575,127.35 46.575,128.35 ; J6.2 101.04,135.545 D7.1 54.88,135.545 D8.1 46.575,135.95 46.575,128.35
NetD3_1: D3.1 D4.2 R15.1 U3.7 | length 33
  Top Layer w0.3: D4.2 90.3,101.075 D3.1 97.775,100.65 v2(100.725,97.7) ; U3.7 104.215,85.775 105.5,87.06 R15.1 105.475,89.175 105.475,90.7 v2(105.45,90.725)
  Bottom Layer w0.3: v2(100.725,97.7) 105.45,92.975 v2(105.45,90.725)
NetD3_2: D3.2 R18.1 | length 96.7
  Top Layer w0.3: D3.2 105.366,104.85 109.566,100.65 109.566,28.641 106.875,25.95 R18.1
NetD4_1: D4.1 R18.3 | length 117.9
  Top Layer w0.3: D4.1 86.908,107.908 104.692,107.908 110.825,101.775 110.825,19.9 106.875,15.95 R18.3
NetD6_1: D6.1 D9.2 J5.1 | length 29.2
  Bottom Layer w1: D6.1 11.825,138.25 29.725,138.25 ; 29.325,138.25 29.325,142.839 29.452,142.967 29.452,144.042 J5.1 ; 29.835,138.14 D9.2
NetD7_2: D7.2 R19.1 | length 37.6
  Bottom Layer w1: R19.1 84.795,125.525 92.275,133.005 D7.2
NetIR1_2: IR1.2 R8.1 | length 10.6
  Top Layer w0.3: IR1.2 45.515,22.15 R8.1
NetIR2_2: IR2.2 R14.1 | length 12.7
  Top Layer w0.5: IR2.2 67.7,20.17 67.7,21.55 68.425,22.275 R14.1
NetJMP1_3: JMP1.3 U4.2 | length 15.1
  Top Layer w0.3: U4.2 89.07,75.225 96.095,68.2 100.36,68.2 JMP1.3
NetLED1_1: LED1.1 R1.1 | length 2.2
  Top Layer w0.6: LED1.1 25.45,16.1 27.4,16.1 R1.1
NetLED2_1: LED2.1 R2.1 | length 6
  Top Layer w0.3: R2.1 19.525,25.7 22.075,23.15 LED2.1
NetQ1_1: Q1.1 R3.1 R5.2 | length 10.2
  Bottom Layer w0.3: Q1.1 19.725,67.55 R5.2 23.55,66.425 23.675,66.425 R3.1
NetQ2_1: Q2.1 R4.1 R6.2 | length 13.8
  Bottom Layer w0.3: Q2.1 20.62,37.45 R4.1 24.475,39.163 23.496,40.142 23.496,42.471 R6.2
NetQ3_1: Q3.1 R9.1 R11.2 | length 11
  Bottom Layer w0.3: Q3.1@18.925,81.06 24.95,81.06 ; R11.2 24.95,81.06 ; R9.1 24.95,79.375 24.95,81.06
NetQ4_1: Q4.1 R10.1 R12.2 | length 9.3
  Bottom Layer w0.3: Q4.1@18.575,52.91 18.61,52.875 R12.2 23.425,52.8 23.425,48.7 R10.1
NetR16_2: R16.2 SW2.1 | length 15.3
  Bottom Layer w0.5: R16.2 90.95,48.65 94.775,44.825 98.776,44.825 101.301,47.35 SW2.1
NetR17_2: R17.2 SW1.1 | length 16.2
  Bottom Layer w0.4: R17.2 91.625,32.825 99.95,32.825 101.475,34.35 101.475,36.474 SW1.1
RF: SW2.2 U2.5 | length 42.2
  Top Layer w0.5: v2(89.7,83.475) 89.705,83.48 89.705,87.22 U2.5
  Bottom Layer w0.5: v2(89.7,83.475) 89.675,83.45 89.675,55.477 96.602,48.55 SW2.2
SD_1: C10.2 IR1.3 R7.1 | length 21.5
  Top Layer w0.3: C10.2 45.495,14.22 IR1.3
  Bottom Layer w0.3: IR1.3 49.339,23.434 49.339,29.211 46.05,32.5 R7.1
SD_2: C14.2 IR2.3 R13.1 | length 22.4
  Top Layer w0.3: IR2.3 70.245,19.766 71,19.011 C14.2
  Bottom Layer w0.3: IR2.3 74.95,24.87 74.95,30.125 72.625,32.45 R13.1
Source1: C4.2 C5.1 C15.2 C18.2 C19.2 IR1.6 J2.2 Q1.3 Q3.2 R5.1 | length 184
  Top Layer w1: Q3.2 18.6,83.745 17.046,85.299 17.046,91.926 18.5,93.38 18.5,100.883 20.021,102.404 24.093,102.404 44.722,81.775 C19.2 ; Q3.2@18.925,83.6 Q3.2@18.925,83.745 ; J2.2 47.43,103.625 C15.2 C18.2 C19.2 ; IR1.6 45.648,27.057 45.648,25.552 46.325,24.875 49.375,24.875 50.65,26.15 50.65,77.975 53.848,81.173 53.848,81.698 C19.2
  Bottom Layer w0.3: R5.1 R5.1@23.75,70.55
  Bottom Layer w0.6: C5.1 45.562,21.962 45.562,24.318 45.572,24.328 45.572,27.132 IR1.6
  Bottom Layer w1: Q3.2 18.474,83.6 17.046,82.172 17.046,77.759 18.4,76.405 18.4,71.505 22.395,71.505 R5.1 ; Q3.2@18.799,83.6 Q3.2@18.925,83.6
Source2: C11.2 C12.1 IR2.6 J3.1 Q2.3 Q4.2 R6.1 | length 162.8
  Top Layer w0.3: C12.1 60.55,31.2 62.425,33.075 C11.2 63.025,33.075 65.851,30.249 67.781,30.249 IR2.6
  Top Layer w1: Q4.2@18.575,55.45 13.175,60.85 13.175,101.925 15.325,104.075 25.61,104.075 J3.1
  Bottom Layer w0.3: R6.1 24.7,39.721 25.679,38.742 25.679,36.71 27.2,35.189 66.808,35.189 68.504,33.492 68.504,29.927 70.245,28.186 IR2.6
  Bottom Layer w1: Q4.2@18.575,55.45 18.449,55.45 17.021,54.022 17.021,46.224 18.6,44.645 Q2.3 18.703,44.55 20.278,46.125 24.75,46.125 26.254,44.621 26.254,42.429 R6.1
pads on no net: M1.1 M2.1 M3.1 M4.1 M5.1 M6.1 U2.8 U2.9 U2.10 U2.11 U2.12 U2.13 U4.3 U4.4 U4.5 U4.6 U4.8 U4.9 U4.10 U4.11 U4.12 U4.13
copper on no net:
  other v1: 6.15,3.4 109.4,3.4 4.453,4.103 7.847,4.103 107.703,4.103 111.097,4.103 3.75,5.8 8.55,5.8 107,5.8 111.8,5.8 4.453,7.497 7.847,7.497 107.703,7.497 111.097,7.497 6.15,8.2 109.4,8.2 6.15,107.6 109,107.6 4.453,108.303 7.847,108.303 107.303,108.303 110.697,108.303 3.75,110 8.55,110 106.6,110 111.4,110 4.453,111.697 7.847,111.697 107.303,111.697 110.697,111.697 6.15,112.4 109,112.4 6.15,147.6 109.4,147.6 4.453,148.303 7.847,148.303 107.703,148.303 111.097,148.303 3.75,150 8.55,150 107,150 111.8,150 4.453,151.697 7.847,151.697 107.703,151.697 111.097,151.697 6.15,152.4 109.4,152.4

## Keep-outs
Keep-Out Layer:
  lines w0.254: 0,115 0,155 115,155 115,115 ; 0,115 115,115 ; 0,115 0,0 115,0 115,115 ; 0,115 115,115

## Other copper
Top Layer:
  text "Artists:" at 12.619,8.389 h8
  text "University of Tehran" at 71.557,6.707 h10
  text "MohammadMehdi FazlollahPour" at 12.625,5.364 h8
  text "GW Summer 1402" at 71.55,2.976 h10
  text "Seyed Amir Hosseini" at 12.625,2.53 h8

## Dimensions
115,0 to 115,155 on Top Overlay
0,155 to 115,155 on Top Overlay

## Text inside footprints (layer, text, board x,y; h text height)
J4: Top Overlay "2" at 61.833,59.713 h1 r90; Top Overlay "1" at 64.5,59.993 h1 r90
LED1: Top Overlay "LED" at 24.723,16.281 h0.8 r180
LED2: Top Overlay "LED" at 22.727,22.644 h0.8